# Altium PCB Gateway-Device-v1.0.PcbDoc (part 4 of 4)
Units mil, origin at the board's own origin, x right, y up, seen from the top; angles counter-clockwise.
Board outline 1968.5 x 3149.61 mil, 4 copper layers (Top Layer, Ground, Power, Bottom Layer), stack 61.654 mil thick; 142 components, 90 nets, 467 pads, 780 vias.
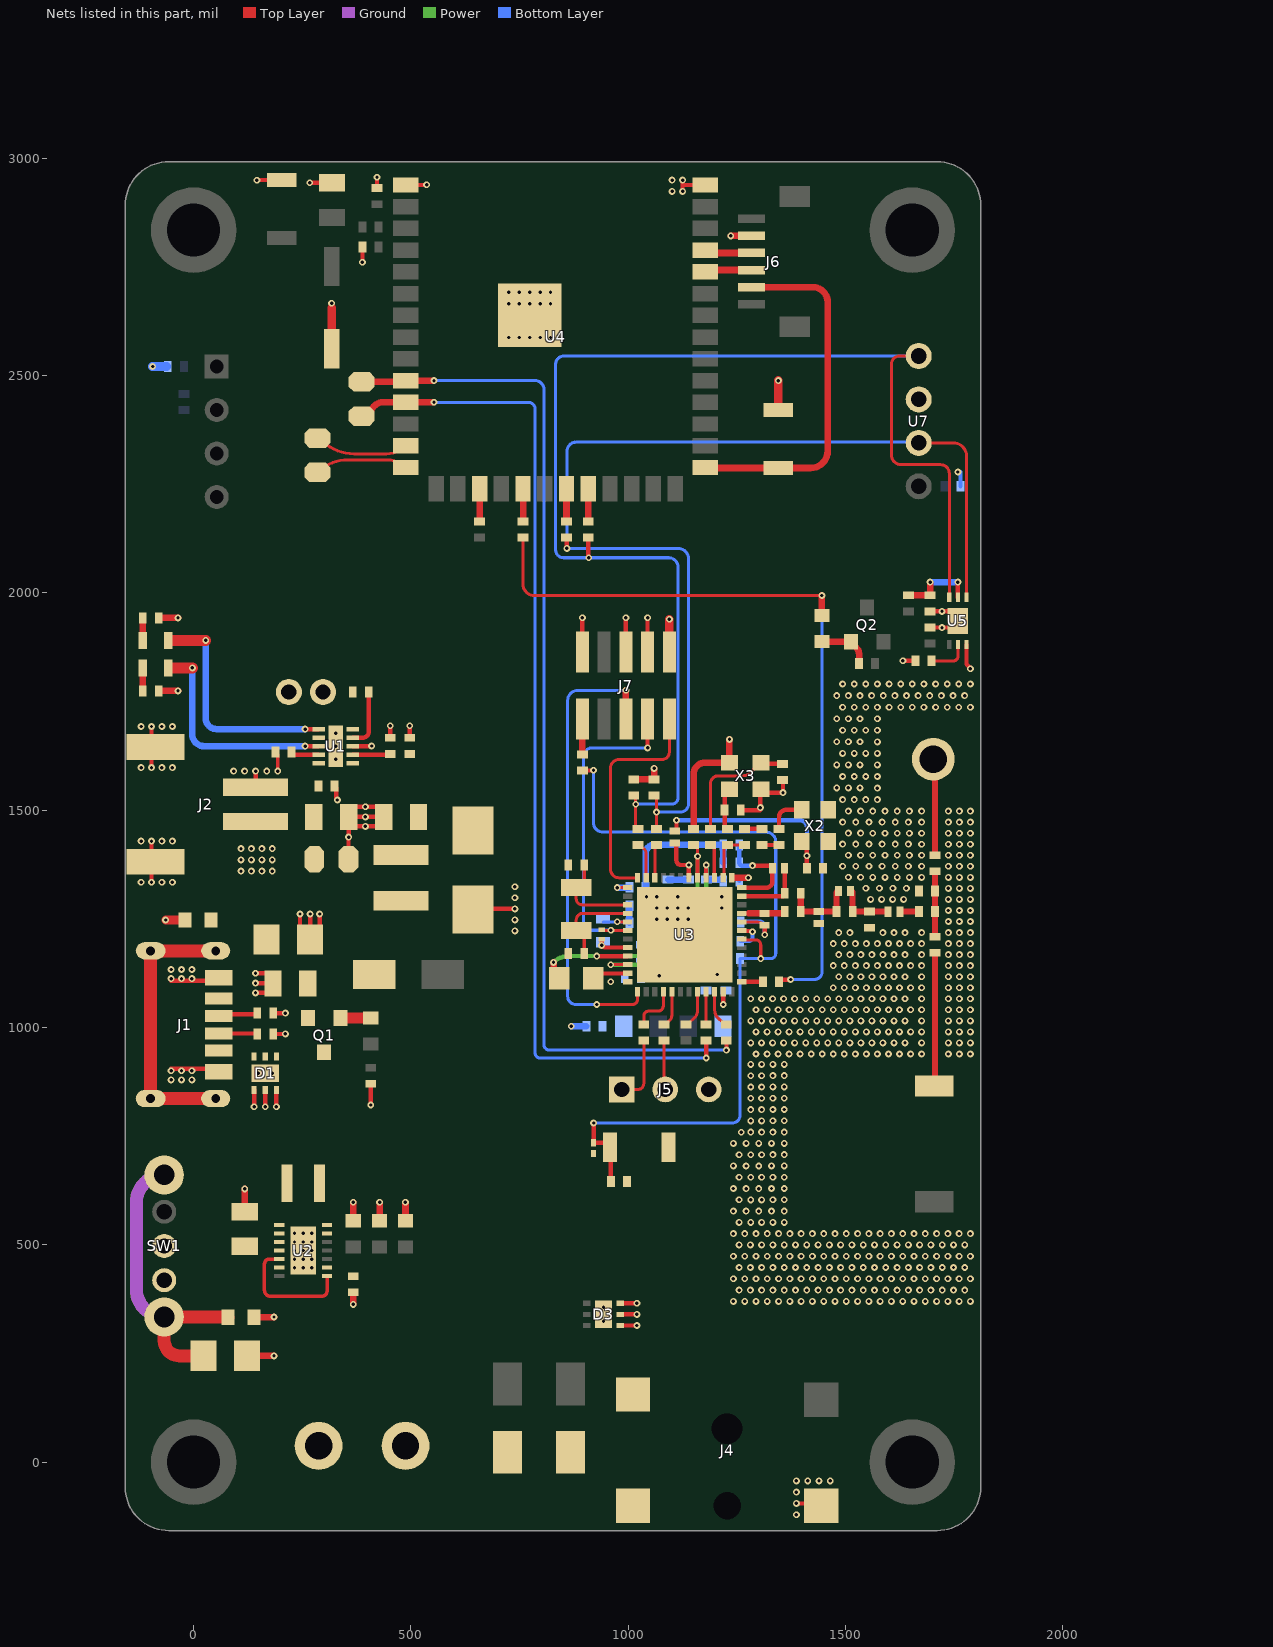
[diagram p4: the nets of this part, all layers, seen from the top]

## Via types
v1: diameter 15.75, hole 7.87, Top Layer to Bottom Layer, tented both sides, 780 vias

## Nets (pads, with @x,y where several pads share a name; then routed paths per layer and width w, separated by ;. In a path a pad name is that pad's centre, name@x,y a point inside that pad or via, vN(x,y) a via of type N, cw(c..) or ccw(c..) an arc to the next point about the centre after c; other vN are vias at no path point) (continued)
GND: C1.1 C2.1 C3.1 C4.1 C5.1 C6.1 C7.1 C8.1 C9.1 C10.1 C11.1 C12.1 C13.2 C14.1 C15.1 C16.1 C17.1 C18.1 C19.1 C20.1 C21.1 C22.1 C23.1 C24.1 C25.1 C26.1 C27.1 C28.1 C29.1 C30.1 C31.1 C35.1 C36.1 C37.1 C38.1 C40.1 C41.1 C42.1 C44.1 C45.1 C46.1 C47.1 C48.1 C49.1 C50.1 D1.1 D1.2 D1.3 D1.7 D2.1 D3.1 D3.2 D3.3 D3.7 D7.2 J1.A12 J1.B12 J2.1 J2.3 J2.4 J3.2 J4.2@1444.06,-100.43 J5.3 J6.2 J7.3 J7.5 J7.9 NTC1.1 R1.2 R3.2 R6.1 R7.1 R8.1 R9.1 R11.1 R25.2 R41.1 SW2.2 SW3.2 SW4.2 TP1.2 U1.3 U1.11 U2.2 U2.13 U2.15 U3.48 U3.49 U4.1 U4.40 U4.41 U5.3 U5.7 U7.3 X2.1 X2.2 X3.2 X3.4 | length 4323.7
  Top Layer w7: R7.1@188.37,1633.65 193.48,1628.54 v1(193.48,1590.09)
  Top Layer w10: v1(-97,1334.26) -97,1372.26 cw(c-87.63,1372.27) J2.3@-87.63,1381.63 cw(c-87.63,1391) -97,1391 v1(-97,1429) ; v1(-96.97,1598.05) -96.97,1636.05 cw(c-87.6,1636.05) J2.4@-87.63,1645.41 cw(c-87.6,1654.78) -96.97,1654.78 v1(-96.97,1692.78) ; v1@-51.93,905.54 -27.93,905.54 -3.93,905.54 50.59,905.54 cw(c50.59,898.26) J1.A12@57.87,898.26 ; v1@-51.93,1107.51 -3.93,1107.51 J1.B12@50.59,1107.51 ; v1(139.09,817.79) D1.1@139.09,856.4 ; v1@142.27,1125.01 C12.1@182.32,1125.01 ; v1@142.63,1079.81 C12.1@182.68,1079.81 ; v1@142.63,1101.65 C12.1@182.68,1101.65 ; J2.1@142.68,1565.07 v1(142.68,1590.09) ; v1(145.4,2949.65) cw(c146.13,2949.65) 146.13,2950.38 SW2.2@202.52,2950.38 ; v1(164.68,817.79) D1.2@164.68,856.4 ; R3.2@183.18,985.29 v1(211,985.29) ; R1.2@183.18,1033.21 v1(211,1033.21) ; v1(190.27,817.79) D1.3@190.27,856.4 ; C5.1@244.65,1221.35 v1(244.65,1261.3) v1@244.65,1261.41 ; v1(267,2944) C14.1@318.58,2944.02 ; C5.1@268,1221 v1@268,1261.05 ; C5.1@289.84,1221 v1@289.84,1261.05 ; C2.1@324.02,1555.99 327.91,1552.11 327.91,1528.01 330.8,1525.12 v1(330.8,1523.57) ; C1.1@356.17,1508.19 v1(395.12,1508.19) C3.1@435.06,1508.19 ; TP1.2@356.32,1384.21 TP1.2@356.32,1387.21 356.32,1434.12 356.52,1434.12 v1(356.52,1438.12) C1.1@356.52,1463 ; U1.3@366.07,1647.34 366.32,1647.59 409.38,1647.59 v1(409.63,1647.85) ; v1(388.37,2760.78) C26.1@388.36,2796.45 ; v1(407.52,821.79) R11.1@407.52,870.52 ; C15.1@421.88,2931.52 v1(421.88,2956.45) ; C3.1@435.42,1463 v1(395.12,1463) C1.1@356.52,1463 ; C3.1@435.42,1484.84 v1(395.12,1484.84) C1.1@356.52,1484.84 C1.1@356.52,1463 ; R8.1@452.41,1666.65 v1(452.41,1694.58) ; U4.1@488.25,2938.74 536.14,2938.74 v1(536.14,2939.12) ; C4.1@497.32,1666.65 v1(497.32,1694.58) ; D2.1@642.52,1271.97 cw(c643.73,1271.97) 643.73,1273.17 v1(739.32,1273.17) ; J7.9@894.45,1863.72 v1(894.45,1943) ; D3.1@981.39,314.41 v1(1020,314.41) ; D3.2@981.39,340 v1(1020,340) ; D3.3@981.39,365.59 v1(1020,365.59) ; J7.5@994.45,1863.72 v1(994.45,1943) ; J7.3@1044.45,1863.72 v1(1044.45,1943) ; v1(1125,2924) 1125,2938.74 ; v1(1125,2950) 1125,2938.74 ; U4.40@1177.22,2938.74 1125,2938.74 ; C44.1@1258.86,1500.38 1303.22,1500.38 ccw(c1303.22,1501.12) 1303.95,1501.12 v1(1303.95,1506.12) 1303.95,1546.79 cw(c1305.78,1546.79) X3.2@1305.78,1548.61 ccw(c1313.77,1548.61) 1313.77,1540.62 v1(1356.05,1540.62) 1356.05,1569.62 C45.1@1355.36,1569.62 ; v1(1387,-95) 1438.63,-95 cw(c1438.63,-100.43) J4.2@1444.06,-100.43 cw(c1444.06,-95.37) J4.2@1439,-95.37 ; v1(1632.02,1843.89) R41.1@1661.02,1843.89 ; C49.1@1694.52,1920.39 v1(1721.96,1920.39) 1743.39,1920.39 ccw(c1743.39,1935.52) U5.7@1758.52,1935.52 ccw(c1736.39,1935.52) 1736.39,1957.66 v1(1721.96,1957.66) C50.1@1694.52,1957.66 ; U5.3@1778.21,1881.39 1778.21,1836.1 1787.15,1827.15 v1(1787.15,1825.6)
  Top Layer w15: C29.1@1150.48,1457.12 1150.48,1583.03 cw(c1177.09,1583.03) 1177.09,1609.63 X3.4@1232.94,1609.63 v1(1232.94,1662.93) ; v1(1236,2821.72) J6.2@1283.63,2821.72
  Top Layer w15.33: C6.1@117.52,576.4 v1(117.52,628.78) ; C10.1@122.76,244.52 v1(184.91,244.52) ; R9.1@138.76,333.41 184.91,333.41 v1(184.91,334.02) ; v1(367.35,363) C11.1@367.35,390.89 ; C7.1@367.34,555.45 v1(367.34,598.12) ; C9.1@427.97,555.45 v1(427.97,598.12) ; C8.1@487.35,555.45 v1(487.35,598.12)
  Top Layer w20: v1(-64.37,1247.52) R6.1@-20.22,1247.52 ; C13.2@317.58,2562.05 317.58,2656.54 ; SW3.2@1345.52,2421.38 v1(1345.52,2488.74)
  Bottom Layer w10: C25.1@1039.87,1241.15 1042.59,1243.87 1042.59,1277.45 C24.1@1039.87,1280.16 1042.09,1282.37 v1(1042.09,1301.05) v1@1040.99,1302.15 ; C23.1@1039.87,1322.89 C23.1@1040.99,1321.78 ; v1@1041.99,1302.15 C23.1@1041.99,1321.78 ; C42.1@1091.8,1301.05 v1(1114.09,1301.05) v1(1215.09,1301.05) ; 1191.09,1249.05 1215.95,1249.05 cw(c1215.95,1243.15) C46.1@1221.86,1243.15 ; C48.1@1764.52,2245.38 v1@1764.52,2278.27
  Bottom Layer w15: C27.1@903.91,1003.1 903.86,1003.05 v1@869.05,1003.05 ; C28.1@1029,1114.46 1029,1152.66 cw(c1029.96,1152.66) C16.1@1029.96,1153.61 C17.1@1071.03,1153.61 1071.09,1153.61 v1(1071.09,1119.05) ; C23.1@1039.87,1322.89 1039.87,1400.79 cw(c1059.37,1400.79) 1059.37,1420.29 C31.1@1218.54,1420.29 C30.1@1218.54,1379.07 ; C22.1@1179.26,1121.96 C18.1@1224.54,1121.96 ; v1(869,1003) v1@869.05,1003.05
  Bottom Layer w20: v1(-94.5,2521) C47.1@-61.97,2521
  other v1: 1387,-121 1387,-69 1387,-43 1413,-43 1439,-43 1465,-43 943,324.2 943,356.8 1242.07,370 1268.03,370 1294,370 1319.97,370 1345.93,370 1371.9,370 1397.86,370 1423.83,370 1449.8,370 1475.76,370 1501.73,370 1527.69,370 1553.66,370 1579.62,370 1605.59,370 1631.56,370 1657.52,370 1683.49,370 1709.45,370 1735.42,370 1761.39,370 1787.35,370 1255.05,395.97 1281.02,395.97 1306.98,395.97 1332.95,395.97 1358.91,395.97 1384.88,395.97 1410.85,395.97 1436.81,395.97 1462.78,395.97 1488.74,395.97 1514.71,395.97 1540.68,395.97 1566.64,395.97 1592.61,395.97 1618.57,395.97 1644.54,395.97 1670.51,395.97 1696.47,395.97 1722.44,395.97 1748.4,395.97 1774.37,395.97 1242.07,421.94 1268.03,421.94 1294,421.94 1319.97,421.94 1345.93,421.94 1371.9,421.94 1397.86,421.94 1423.83,421.94 1449.8,421.94 1475.76,421.94 1501.73,421.94 1527.69,421.94 1553.66,421.94 1579.62,421.94 1605.59,421.94 1631.56,421.94 1657.52,421.94 1683.49,421.94 1709.45,421.94 1735.42,421.94 1761.39,421.94 1787.35,421.94 1255.05,447.9 1281.02,447.9 1306.98,447.9 1332.95,447.9 1358.91,447.9 1384.88,447.9 1410.85,447.9 1436.81,447.9 1462.78,447.9 1488.74,447.9 1514.71,447.9 1540.68,447.9 1566.64,447.9 1592.61,447.9 1618.57,447.9 1644.54,447.9 1670.51,447.9 1696.47,447.9 1722.44,447.9 1748.4,447.9 1774.37,447.9 1242.07,473.87 1268.03,473.87 1294,473.87 1319.97,473.87 1345.93,473.87 1371.9,473.87 1397.86,473.87 1423.83,473.87 1449.8,473.87 1475.76,473.87 1501.73,473.87 1527.69,473.87 1553.66,473.87 1579.62,473.87 1605.59,473.87 1631.56,473.87 1657.52,473.87 1683.49,473.87 1709.45,473.87 1735.42,473.87 1761.39,473.87 1787.35,473.87 1255.05,499.83 1281.02,499.83 1306.98,499.83 1332.95,499.83 1358.91,499.83 1384.88,499.83 1410.85,499.83 1436.81,499.83 1462.78,499.83 1488.74,499.83 1514.71,499.83 1540.68,499.83 1566.64,499.83 1592.61,499.83 1618.57,499.83 1644.54,499.83 1670.51,499.83 1696.47,499.83 1722.44,499.83 1748.4,499.83 1774.37,499.83 1242.07,525.8 1268.03,525.8 1294,525.8 1319.97,525.8 1345.93,525.8 1371.9,525.8 1397.86,525.8 1423.83,525.8 1449.8,525.8 1475.76,525.8 1501.73,525.8 1527.69,525.8 1553.66,525.8 1579.62,525.8 1605.59,525.8 1631.56,525.8 1657.52,525.8 1683.49,525.8 1709.45,525.8 1735.42,525.8 1761.39,525.8 1787.35,525.8 1255.05,551.77 1282,551.64 1307.01,551.64 1332.92,551.77 1358.89,551.77 1242.07,577.73 1271.27,577.6 1300.48,577.6 1329.68,577.73 1358.89,577.73 1255.05,603.7 1282,603.57 1307.01,603.57 1332.92,603.7 1358.89,603.7 1242.07,629.66 1271.27,629.54 1300.48,629.54 1329.68,629.66 1358.89,629.66 1255.05,655.63 1282,655.5 1307.01,655.5 1332.92,655.63 1358.89,655.63 1271.27,681.47 1300.48,681.47 1242.07,681.6 1329.68,681.6 1358.89,681.6 1255.05,707.31 1282,707.43 1307.01,707.43 1332.92,707.56 1358.89,707.56 1271.27,733.4 1300.48,733.4 1242.07,733.53 1329.68,733.53 1358.89,733.53 1260.05,758.98 1282,759.36 1307.01,759.36 1332.92,759.49 1358.89,759.49 1282,785.33 1307.01,785.33 1332.92,785.46 1358.89,785.46 1282,811.3 1307.01,811.3 1332.92,811.42 1358.89,811.42 1282,837.26 1307.01,837.26 1332.92,837.39 1358.89,837.39 1282,863.23 1307.01,863.23 1332.92,863.36 1358.89,863.36 -51.93,879.54 -27.93,879.54 -3.93,879.54 1282,889.19 1307.01,889.19 1332.92,889.32 1358.89,889.32 148.88,894.79 181.47,894.79 -51.93,900.54 -27.93,900.54 -3.93,900.54 1282,915.16 1307.01,915.16 1332.92,915.29 1358.89,915.29 1294,939.2 1319.4,939.2 1344.8,939.2 1370.2,939.2 1395.6,939.2 1421,939.2 1446.4,939.2 1471.8,939.2 1497.2,939.2 1522.6,939.2 1548,939.2 1573.4,939.2 1598.8,939.2 1624.2,939.2 1649.6,939.2 1675,939.2 1736.55,939.2 1761.95,939.2 1787.35,939.2 1282,964.6 1306.7,964.6 1332.1,964.6 1357.5,964.6 1382.9,964.6 1408.3,964.6 1433.7,964.6 1459.1,964.6 1484.5,964.6 1509.9,964.6 1535.3,964.6 1560.7,964.6 1586.1,964.6 1611.5,964.6 1636.9,964.6 1675,964.6 1736.55,964.6 1761.95,964.6 1787.35,964.6 1294,990 1319.4,990 1344.8,990 1370.2,990 1395.6,990 1421,990 1446.4,990 1471.8,990 1497.2,990 1522.6,990 1548,990 1573.4,990 1598.8,990 1624.2,990 1649.6,990 1675,990 1736.55,990 1761.95,990 1787.35,990 1282,1015.4 1306.7,1015.4 1332.1,1015.4 1357.5,1015.4 1382.9,1015.4 1408.3,1015.4 1433.7,1015.4 1459.1,1015.4 1484.5,1015.4 1509.9,1015.4 1535.3,1015.4 1560.7,1015.4 1586.1,1015.4 1611.5,1015.4 1636.9,1015.4 1675,1015.4 1736.55,1015.4 1761.95,1015.4 1787.35,1015.4 1294,1040.8 1319.4,1040.8 1344.8,1040.8 1370.2,1040.8 1395.6,1040.8 1421,1040.8 1446.4,1040.8 1471.8,1040.8 1497.2,1040.8 1522.6,1040.8 1548,1040.8 1573.4,1040.8 1598.8,1040.8 1624.2,1040.8 1649.6,1040.8 1675,1040.8 1736.55,1040.8 1761.95,1040.8 1787.35,1040.8 1282,1066.2 1306.7,1066.2 1332.1,1066.2 1357.5,1066.2 1382.9,1066.2 1408.3,1066.2 1433.7,1066.2 1459.1,1066.2 1484.5,1066.2 1509.9,1066.2 1535.3,1066.2 1560.7,1066.2 1586.1,1066.2 1611.5,1066.2 1636.9,1066.2 1675,1066.2 1736.55,1066.2 1761.95,1066.2 1787.35,1066.2 142.37,1079.81 1471.8,1091.6 1497.2,1091.6 1522.6,1091.6 1548,1091.6 1573.4,1091.6 1598.8,1091.6 1624.2,1091.6 1649.6,1091.6 1675,1091.6 1736.55,1091.6 1761.95,1091.6 1787.35,1091.6 142.37,1102.41 959.7,1105.26 -51.93,1112.51 -27.93,1112.51 -3.93,1112.51 1484.5,1117 1509.9,1117 1535.3,1117 1560.7,1117 1586.1,1117 1611.5,1117 1636.9,1117 1675,1117 1736.55,1117 1761.95,1117 1787.35,1117 1204.72,1122.01 142.37,1125.01 -51.93,1133.51 -27.93,1133.51 -3.93,1133.51 1471.8,1142.4 1497.2,1142.4 1522.6,1142.4 1548,1142.4 1573.4,1142.4 1598.8,1142.4 1624.2,1142.4 1649.6,1142.4 1675,1142.4 1736.55,1142.4 1761.95,1142.4 1787.35,1142.4 1484.5,1167.8 1509.9,1167.8 1535.3,1167.8 1560.7,1167.8 1586.1,1167.8 1611.5,1167.8 1636.9,1167.8 1675,1167.8 1736.55,1167.8 1761.95,1167.8 1787.35,1167.8 1471.8,1193.2 1497.2,1193.2 1522.6,1193.2 1548,1193.2 1573.4,1193.2 1598.8,1193.2 1624.2,1193.2 1649.6,1193.2 1675,1193.2 1736.55,1193.2 1761.95,1193.2 1787.35,1193.2 1484.5,1218.6 1509.9,1218.6 1586.1,1218.6 1611.5,1218.6 1636.9,1218.6 1675,1218.6 1736.55,1218.6 1761.95,1218.6 1787.35,1218.6 739.32,1222.37 1736.55,1244 1761.95,1244 1787.35,1244 739.32,1247.77 1066.09,1249.05 1090.09,1249.05 1114.09,1249.05 1138.09,1249.05 268,1261.3 289.84,1261.3 1736.55,1269.4 1761.95,1269.4 1787.35,1269.4 1066.09,1275.05 1090.09,1275.05 1114.09,1275.05 1138.09,1275.05 1215.09,1275.05 1557.56,1294.8 1582.96,1294.8 1608.36,1294.8 1633.76,1294.8 1736.55,1294.8 1761.95,1294.8 1787.35,1294.8 739.32,1298.57 1066.09,1301.05 1546.88,1320.38 1577.88,1320.38 1608.88,1320.38 1639.88,1320.38 1736.55,1320.2 1761.95,1320.2 1787.35,1320.2 739.32,1323.97 -121,1334.26 -73,1334.26 -49,1334.26 1506.54,1345.78 1534.62,1345.78 1562.69,1345.6 1590.77,1345.6 1618.85,1345.6 1646.92,1345.6 1675,1345.6 1736.55,1345.6 1761.95,1345.6 1787.35,1345.6 1493.4,1371.18 1523.66,1371.18 1553.93,1371.18 1584.2,1371.18 1614.47,1371.18 1644.73,1371.18 1675,1371 1736.55,1371 1761.95,1371 1787.35,1371 1562.69,1396.4 1590.77,1396.4 1618.85,1396.4 1646.92,1396.4 1675,1396.4 1736.55,1396.4 1761.95,1396.4 1787.35,1396.4 1506.54,1396.58 1534.62,1396.58 1493.4,1421.98 1523.66,1421.98 1553.93,1421.98 1584.2,1421.98 1614.47,1421.98 1644.73,1421.98 1675,1421.8 1736.55,1421.8 1761.95,1421.8 1787.35,1421.8 -121,1429 -73,1429 -49,1429 1506.54,1447.38 1534.62,1447.38 1562.69,1447.2 1590.77,1447.2 1618.85,1447.2 1646.92,1447.2 1675,1447.2 1736.55,1447.2 1761.95,1447.2 1787.35,1447.2 1493.4,1472.78 1523.66,1472.78 1553.93,1472.78 1584.2,1472.78 1614.47,1472.78 1644.73,1472.78 1675,1472.6 1736.55,1472.6 1761.95,1472.6 1787.35,1472.6 1506.54,1498.18 1534.62,1498.18 1562.69,1498 1590.77,1498 1618.85,1498 1646.92,1498 1675,1498 1736.55,1498 1761.95,1498 1787.35,1498 1493.17,1524.56 1519.91,1524.56 1546.66,1524.56 1573.4,1524.56 1479.8,1551.3 1506.54,1551.3 1533.28,1551.3 1573.4,1551.12 1493.17,1577.68 1519.91,1577.68 1546.66,1577.68 1573.4,1577.68 91.88,1590.09 117.28,1590.09 168.08,1590.09 -120.97,1598.05 -72.97,1598.05 -48.97,1598.05 1479.8,1604.43 1506.54,1604.43 1533.28,1604.43 1573.4,1604.24 326.89,1617.65 1493.17,1630.8 1519.91,1630.8 1546.66,1630.8 1573.4,1630.8 326.89,1647.34 1573.4,1657.36 1479.8,1657.55 1506.54,1657.55 1533.28,1657.55 326.89,1677.02 1493.17,1683.92 1519.91,1683.92 1546.66,1683.92 1573.4,1683.92 -120.97,1692.78 -72.97,1692.78 -48.97,1692.78 1479.8,1710.67 1506.54,1710.67 1533.28,1710.67 1573.4,1710.48 1493.17,1737.05 1519.91,1737.05 1546.66,1737.05 1573.4,1737.05 1600.14,1737.05 1626.89,1737.05 1653.63,1737.05 1680.38,1737.05 1707.12,1737.05 1733.86,1737.05 1760.61,1737.05 1787.35,1737.05 1479.8,1763.79 1506.54,1763.79 1533.28,1763.79 1560.03,1763.79 1586.77,1763.79 1613.52,1763.79 1640.26,1763.79 1667,1763.79 1693.75,1763.79 1720.49,1763.79 1747.24,1763.79 1773.98,1763.79 1493.17,1790.53 1519.91,1790.53 1546.66,1790.53 1573.4,1790.53 1600.14,1790.53 1626.89,1790.53 1653.63,1790.53 1680.38,1790.53 1707.12,1790.53 1733.86,1790.53 1760.61,1790.53 1787.35,1790.53 1758.51,2278.28 725.15,2587.77 749.15,2587.77 773.15,2587.77 797.15,2587.77 821.15,2587.77 725.15,2665.77 749.15,2665.77 773.15,2665.77 797.15,2665.77 821.15,2665.77 317.58,2666.54 725.15,2691.77 749.15,2691.77 773.15,2691.77 797.15,2691.77 821.15,2691.77 1101,2924 1101,2950
I2C2_SCL: R19.1 R23.1 R33.1 U5.6 U7.4 | length 3068.2
  Top Layer w7: v1@907.93,2082.07 ccw(c909,2082.07) v1(909,2081) ; R33.1@1017.2,1535.68 1017.2,1462.6 ccw(c1022.69,1462.6) R19.1@1022.69,1457.12 ; U7.4@1668.32,2545.38 1624,2545.38 ccw(c1624,2527.38) 1606,2527.38 1606,2316.8 ccw(c1627.7,2316.8) 1627.7,2295.11 1718.7,2295.11 cw(c1718.7,2274.96) 1738.84,2274.96 U5.6@1738.84,1989.66
  Top Layer w10: v1@907.93,2082.07 R23.1@907.93,2127.52
  Bottom Layer w7: v1(1017.31,1514) 1099.37,1514 ccw(c1099.37,1529.32) 1114.69,1529.32 1114.69,2059.59 ccw(c1093.28,2059.59) 1093.28,2081 v1(909,2081) 850.92,2081 cw(c850.92,2098.92) 833,2098.92 833,2526.48 cw(c851.9,2526.48) 851.9,2545.38 U7.4@1668.32,2545.38
I2C2_SDA: R18.1 R22.1 R32.1 U5.4 U7.2 | length 2545
  Top Layer w7: R22.1@857.93,2127.52 R22.1@858.77,2126.69 ; R32.1@1059.67,1534.12 1065,1528.79 v1(1065,1495.63) 1065,1457.45 R18.1@1064.67,1457.12 ; U7.2@1668.32,2345.38 1748,2345.38 cw(c1748,2315.17) 1778.21,2315.17 U5.4@1778.21,1989.66
  Top Layer w10: v1(858.76,2102.59) R22.1@858.77,2126.69
  Bottom Layer w7: v1@1065,1496 1120.67,1496 ccw(c1120.67,1513.77) 1138.44,1513.77 1138.44,2079.11 ccw(c1114.96,2079.11) 1114.96,2102.59 v1(858.76,2102.59) 858.76,2325.58 cw(c880.18,2325.58) 880.18,2347 1666.71,2347 cw(c1666.71,2345.38) U7.2@1668.32,2345.38
IO0: J6.5 SW3.1 U4.27 | length 841.9
  Top Layer w15.33: U4.27@1177.22,2288.74 1178.44,2287.52 1419.52,2287.52 ccw(c1419.52,2327) 1459,2327 1459,2669 ccw(c1424.39,2669) 1424.39,2703.61 J6.5@1283.63,2703.61
NetANT1_1: ANT1.1 R30.2 | length 306.5
  Top Layer w13.98: ANT1.1@1705.78,865.54 R30.2@1705.78,1172.02
NetANT2_1: ANT2.1 R35.2 | length 222.5
  Top Layer w13.98: ANT2.1@1701.96,1617.52 1705.82,1613.67 R35.2@1705.82,1396.63
NetC3_2: C3.2 C4.2 D2.2 F1.2 U1.1
NetC5_2: C5.2 J1.MH1 J1.MH2 J1.MH3 J1.MH4 R6.2 | length 639.4
  Top Layer w30: J1.MH1@50.78,836.44 J1.MH2@-98.82,836.44 J1.MH3@-98.82,1176.6 J1.MH4@50.78,1176.6
NetC10_2: C10.2 R9.2 SW1.4 SW1.5 | length 712.5
  Top Layer w30: C10.2@22.76,244.52 -32.69,244.52 cw(c-32.69,279.52) -67.69,279.52 SW1.5@-67.69,334.02 77.15,334.02 cw(c77.15,332.41) R9.2@78.76,332.41
  Ground w30: SW1.5@-67.69,334.02 cw(c-67.69,398.33) -132,398.33 -132,596.48 cw(c-67.69,596.48) SW1.4@-67.69,660.79
NetC11_2: C11.2 U2.1 U2.12 | length 293.8
  Top Layer w8: U2.12@196.72,467.26 173.95,467.26 ccw(c173.95,456.31) 163,456.31 163,395.08 ccw(c176.2,395.08) 176.2,381.89 295.65,381.89 ccw(c295.65,393.19) 306.96,393.19 U2.1@306.96,427.89
NetC19_2: C19.2 U3.39 X1.2 | length 214.5
  Top Layer w7: C19.2@898.8,1373.62 898.8,1340.39 cw(c880.3,1340.39) X1.2@880.3,1321.89 880.3,1296.3 ccw(c894.08,1296.3) 894.08,1282.52 U3.39@999.05,1282.52
NetC20_2: C20.2 U3.40 X1.1 | length 215.1
  Top Layer w7: C20.2@898.8,1170.31 898.8,1204.96 ccw(c880.3,1204.96) X1.1@880.3,1223.46 880.3,1247.09 cw(c896.05,1247.09) 896.05,1262.83 U3.40@999.05,1262.83
NetC24_2: C24.2 C25.2 FB1.2 U3.41 | length 126.6
  Top Layer w7: v1(974.7,1243.44) 974.7,1243.15 U3.41@999.05,1243.15
  Bottom Layer w7: FB1.2@941.95,1243.18 C25.2@1002.87,1243.18
  Bottom Layer w15: C25.2@1002.87,1241.15 C24.2@1002.87,1282.16
NetC30_2: C30.2 C31.2 L3.2 U3.24 | length 230.9
  Top Layer w10: U3.24@1260.86,1321.89 1318.14,1321.89 ccw(c1318.14,1335.49) 1331.74,1335.49 L3.2@1331.74,1366.7 ; v1(1286,1372.7) L3.2@1331.74,1372.7
  Bottom Layer w10: C31.2@1255.54,1420.29 C30.2@1255.54,1379.07 ccw(c1261.91,1379.07) 1261.91,1372.7 v1(1286,1372.7)
NetC32_1: C32.1 C33.2 C36.2 C39.2 L4.1 | length 174.8
  Top Layer w13.98: C33.2@1397,1309.11 C39.2@1397,1266.77 C36.2@1438.55,1266.77 C32.1@1479.47,1266.77 1479.47,1309.38 cw(c1484.2,1309.38) L4.1@1484.2,1314.11
NetC32_2: C32.2 C37.2 L4.2 L5.1 | length 131.2
  Top Layer w13.98: L4.2@1511.75,1314.11 cw(c1511.75,1309.4) 1516.47,1309.4 C32.2@1516.47,1266.77 C37.2@1555.52,1266.77 L5.1@1597.67,1266.77
NetC33_1: C33.1 L3.1 U3.23 | length 160.6
  Top Layer w10: U3.23@1260.86,1302.2 1356,1302.2 1360,1306.2 L3.1@1360,1366.01
NetC34_1: C34.1 L5.2 | length 41.5
  Top Layer w13.98: L5.2@1625.23,1266.77 C34.1@1666.71,1266.77
NetC34_2: C34.2 C38.2 R30.1 R35.1 | length 150.5
  Top Layer w13.98: R30.1@1705.71,1209.02 C34.2@1705.71,1266.77 C38.2@1705.71,1314.11 R35.1@1705.71,1359.52
NetC35_2: C35.2 FB2.1 X2.4 | length 468.3
  Top Layer w10: FB2.1@1110.8,1452.39 1111,1452.6 v1(1111,1477) ; X2.4@1398.95,1428.29 cw(c1398.95,1416.28) 1410.97,1416.28 C35.2@1410.97,1366.7
  Bottom Layer w10: v1(1111,1477) 1395.58,1477 cw(c1395.58,1461.41) 1411.17,1461.41 v1(1411.17,1395.27)
NetC39_1: C39.1 L6.2 U3.21 | length 85.5
  Top Layer w15: 1277.37,1263.01 1358.5,1263.01 1360,1264.51 C39.1@1360,1266.77
NetC43_1: C43.1 R36.2 | length 43
  Top Layer w10: C43.1@1303.95,1420.12 R36.2@1346.91,1420.12
NetC43_2: C43.2 R37.1 | length 43.1
  Top Layer w10: R37.1@1260.86,1457.12 C43.2@1303.95,1457.12
NetC44_2: C44.2 R38.1 X3.1 | length 92.4
  Top Layer w10: X3.1@1221.86,1548.61 C44.2@1221.86,1500.38 1221.86,1458.8 ccw(c1223.54,1458.8) R38.1@1223.54,1457.12
NetC45_2: C45.2 R39.1 X3.3 | length 292.5
  Top Layer w7: R39.1@1189.59,1457.11 1189.59,1562.12 cw(c1206.59,1562.12) 1206.59,1579.12 1261.8,1579.12 ccw(c1261.8,1609.63) 1285.41,1590.31 1289.59,1595.42 X3.3@1305.78,1609.63
  Top Layer w10: X3.3@1305.78,1609.63 ccw(c1313.05,1616.9) 1313.05,1606.62 C45.2@1355.36,1606.62
NetC46_2: C46.2 L6.1 U3.20 | length 157.3
  Top Layer w7: U3.20@1260.86,1243.15 1294.78,1243.15 cw(c1294.78,1216.27) L6.1@1313.79,1235.28 ; v1@1313.79,1213.75 v1(1313.99,1213.55)
  Top Layer w10: v1@1313.79,1213.75 L6.1@1313.79,1235.28
  Bottom Layer w7: C46.2@1258.86,1243.15 cw(c1259.83,1243.15) C46.2@1259.83,1244.12
  Bottom Layer w10: C46.2@1259.83,1244.12 1300.32,1244.12 cw(c1300.32,1230.65) 1313.79,1230.65 1313.79,1213.55 v1(1313.99,1213.55)
NetC50_2: C50.2 R40.1 U5.5 | length 180.4
  Top Layer w7: R40.1@1644.52,1995.85 ccw(c1645.72,1995.85) R40.1@1645.72,1994.66
  Top Layer w10: U5.5@1758.52,1989.66 v1(1758.52,2025)
  Top Layer w15: R40.1@1645.72,1994.66 C50.2@1694.52,1994.66 v1(1694.52,2025)
  Bottom Layer w15: v1(1694.52,2025) v1(1758.52,2025)
NetD4_2: D4.2 J3.1
NetD5_2: D5.2 J4.1
NetJ1_A5: J1.A5 R1.1 | length 91.2
  Top Layer w10: J1.A5@57.87,1026.21 62.29,1030.62 143.59,1030.62 R1.1@146.18,1033.21
NetJ1_B5: J1.B5 R3.1 | length 88
  Top Layer w10: J1.B5@58.53,986.18 145.29,986.18 R3.1@146.18,985.29
NetL1_1: L1.1 U2.8 U2.9
NetL1_2: L1.2 U2.6 U2.7
NetL2_2: L2.2 U3.47 | length 84.2
  Top Layer w9: L2.2@930.92,1124.66 U3.47@998.67,1124.66
  Top Layer w10: L2.2@919.67,1113.41 L2.2@930.92,1124.66 ; U3.47@998.67,1124.66 U3.47@999.05,1125.04
NetLED1_1: LED1.1 R2.1 | length 52.9
  Top Layer w15: R2.1@-117.16,1774.63 LED1.1@-117.16,1827.52
NetLED1_2: LED1.2 U1.8 | length 510.5
  Top Layer w10: v1(256.52,1647.53) 278.15,1647.53 U1.8@287.72,1647.34
  Top Layer w25: LED1.2@-54.28,1827.52 v1(-3,1827.52)
  Bottom Layer w15: v1(-3,1827.52) -3,1674.29 ccw(c23.77,1674.29) 23.77,1647.53 v1(256.52,1647.53)
NetLED2_1: LED2.1 R4.1 | length 51.8
  Top Layer w15: LED2.1@-117.16,1890.76 R4.1@-117.16,1942.52
NetNTC1_2: NTC1.2 R5.1 U1.5
NetQ1_1: Q1.1 R10.2 | length 70
  Top Layer w25: Q1.1@337.48,1022.2 R10.2@407.52,1022.2
NetQ2_1: Q2.1 R43.2 R44.2 | length 123.8
  Top Layer w15: R44.2@1445.52,1888.01 Q2.1@1512.12,1888.01 1524.76,1873.72 cw(c1512.12,1859.67) 1531.02,1859.67 R43.2@1531.02,1837.42
NetR5_2: R5.2 U1.4 | length 136
  Top Layer w10: U1.4@366.07,1667.02 389.18,1667.02 ccw(c389.18,1680.91) 403.07,1680.91 R5.2@403.07,1772.02
NetR7_2: R7.2 U1.9 | length 65.8
  Top Layer w10: R7.2@225.37,1633.65 ccw(c231.37,1633.65) 231.37,1627.65 U1.9@287.72,1627.65
NetR8_2: R8.2 U1.2 | length 88.6
  Top Layer w10: U1.2@366.07,1627.65 448.41,1627.65 ccw(c448.41,1631.65) R8.2@452.41,1631.65
NetR12_2: R12.2 U3.8 | length 86.8
  Top Layer w7: R12.2@1133.15,1007.12 1142.15,1012.62 1151.35,1021.43 ccw(c1133.15,1040.46) 1159.48,1040.46 U3.8@1159.48,1082.72
NetR13_2: R13.2 U3.9 | length 78.3
  Top Layer w7: R13.2@1174.35,1007.12 ccw(c1174.35,1011.94) 1179.17,1011.94 U3.9@1179.17,1082.72
NetR14_2: R14.2 U3.10 | length 86.8
  Top Layer w7: U3.10@1198.85,1082.72 1198.85,1040.46 ccw(c1225.19,1040.46) 1206.98,1021.43 1216.19,1012.62 R14.2@1225.19,1007.12
NetR15_2: R15.2 U3.13 | length 49.2
  Top Layer w10: U3.13@1260.86,1105.35 R15.2@1310.02,1105.35
NetR16_1: R16.1 U3.4 | length 110.5
  Top Layer w7: R16.1@1035.74,1007.12 1035.74,1026.75 cw(c1046.81,1026.75) 1046.81,1037.81 1068.37,1037.81 ccw(c1068.37,1050.19) 1080.74,1050.19 U3.4@1080.74,1082.72
NetR17_1: R17.1 U3.5 | length 83.9
  Top Layer w7: R17.1@1081.94,1007.12 1090.94,1012.62 1094.02,1015.28 ccw(c1081.94,1029.27) 1100.43,1029.27 U3.5@1100.43,1082.72
NetR18_2: R18.2 U3.34 | length 77.7
  Top Layer w7: U3.34@1061.06,1344.53 1061.06,1416.51 cw(c1064.67,1416.51) R18.2@1064.67,1420.12
NetR19_2: R19.2 U3.35 | length 84.2
  Top Layer w7: R19.2@1022.69,1420.12 1031.69,1414.62 1033.27,1413.53 cw(c1022.69,1398.13) 1041.37,1398.13 U3.35@1041.37,1344.53
NetR20_2: R20.2 U4.17 | length 75
  Top Layer w15: R20.2@657.93,2164.52 U4.17@657.93,2239.52
NetR21_2: R21.2 U4.19 | length 75.4
  Top Layer w15: R21.2@757.52,2164.52 757.93,2164.52 U4.19@757.93,2239.52
NetR22_2: R22.2 U4.21 | length 75
  Top Layer w15: R22.2@857.93,2164.52 U4.21@857.93,2239.52
NetR23_2: R23.2 U4.22 | length 75
  Top Layer w15: R23.2@907.93,2164.52 U4.22@907.93,2239.52
NetR24_1: R24.1 U3.19 | length 71.1
  Top Layer w9: U3.19@1260.86,1223.46 1261.95,1222.37 v1@1286,1222.37
  Bottom Layer w9: R24.1@1257.86,1198.57 1275.74,1198.57 ccw(c1275.74,1208.83) 1286,1208.83 v1(1286,1220.37)
NetR24_2: R24.2 R25.1 | length 38.5
  Bottom Layer w10: R25.1@1182.36,1198.57 R24.2@1220.86,1198.57
NetR36_1: R36.1 X2.3 | length 88.7
  Top Layer w10: R36.1@1346.91,1457.12 1346.91,1484.02 cw(c1364.01,1484.02) 1351.92,1496.11 cw(c1364.01,1484.02) 1364.01,1501.12 X2.3@1398.95,1501.12
NetR37_2: R37.2 R38.2 U3.26 | length 120.6
  Top Layer w7: U3.26@1218.54,1344.53 1220.4,1346.4 1220.4,1414.62 1225.9,1420.12 R38.2@1228.54,1420.12 R37.2@1267.86,1420.12
NetR39_2: R39.2 U3.27 | length 81.1
  Top Layer w7: R39.2@1189.59,1420.11 1192.41,1420.11 1197.91,1414.61 1197.91,1345.47 U3.27@1198.85,1344.53
NetR41_2: R41.2 U5.2 | length 93.8
  Top Layer w7: R41.2@1698.02,1843.89 1748.79,1843.89 ccw(c1748.79,1853.62) 1758.52,1853.62 U5.2@1758.52,1881.39
NRST: C21.2 D7.1 R29.2 R45.1 SW4.1 U3.18 | length 1896.6
  Top Layer w7: U3.18@1260.86,1203.78 U3.18@1260.94,1203.86 ; U3.18@1260.94,1201.86 1293.42,1201.86 cw(c1293.42,1190.36) 1304.92,1190.36 v1(1304.92,1158.5)
  Top Layer w10: R29.2@894.45,1591.4 920,1591.4 v1(920,1592) ; v1(920.28,780.44) D7.1@920.28,734.98 948.35,734.98 cw(c948.35,724.98) SW4.1@958.35,724.98 cw(c958.35,723.33) 960,723.33 C21.2@960,646
  Bottom Layer w7: v1(920,1592) 920,1471.14 ccw(c941.51,1471.14) 941.51,1449.62 1317.38,1449.62 cw(c1317.38,1427.57) 1339.44,1427.57 1339.44,1170.63 cw(c1327.31,1170.63) 1327.31,1158.5 1313.99,1158.5 R45.1@1257.19,1158.5 1257.19,797.85 cw(c1239.78,797.85) 1239.78,780.44 v1(920.28,780.44)
PB0-VDD_TCXO: C41.2 C42.2 FB2.2 U3.30 | length 185.5
  Top Layer w10: FB2.2@1110.8,1424.83 1110.8,1385.2 ccw(c1122,1385.2) 1122,1374 v1(1139.61,1374) 1139.61,1344.53 U3.30@1139.8,1344.53
  Bottom Layer w10: C41.2@1138.8,1340.53 1139.8,1341.53 1139.8,1373.81 v1(1139.61,1374)
  Bottom Layer w15: C42.2@1091.8,1340.53 C41.2@1138.8,1340.53
PG: LED2.2 U1.6 U1.7 | length 537
  Top Layer w10: v1(256.52,1686.71) U1.6@287.72,1686.71
  Top Layer w25: LED2.2@-55.45,1890.76 27.76,1890.76 v1(28,1891)
  Bottom Layer w15: v1(28,1891) 28,1711.36 ccw(c52.65,1711.36) 52.65,1686.71 v1(256.52,1686.71)
PWR_SW: R15.1 R21.1 R44.1 | length 1831.1
  Top Layer w7: R21.1@757.52,2127.52 757.52,2020.67 ccw(c784.04,2020.67) 784.04,1994.16 v1(1445.52,1994.16)
  Top Layer w10: R15.1@1347.02,1110.35 v1@1373.54,1110.35
  Top Layer w15: R44.1@1445.52,1948.01 v1(1445.52,1994.16)
  Bottom Layer w7: v1@1373.54,1111 1429.87,1111 ccw(c1429.87,1126.65) 1445.52,1126.65 v1(1445.52,1994.16)
  other v1: 1373.54,1110.55
RST: J7.10 R29.1 | length 81.8
  Top Layer w15: R29.1@894.45,1628.4 J7.10@894.45,1710.18
RXD0: J6.4 U4.36 | length 107.5
  Top Layer w15.33: U4.36@1177.22,2738.74 cw(c1187.48,2728.48) 1187.48,2742.98 J6.4@1283.63,2742.98
SWDCLK: J7.4 R31.1 U3.42 | length 742.3
  Top Layer w7: R31.1@939,1223.64 U3.42@998.87,1223.64
  Top Layer w10: v1(1044.45,1643.62) J7.4@1044.45,1710.18
  Bottom Layer w7: v1(959.95,1223.9) 910.84,1223.9 cw(c910.84,1237.87) 896.87,1237.87 896.87,1623.66 cw(c916.82,1623.66) 916.82,1643.62 v1(1044.45,1643.62)
SWDIO: J7.2 U3.36 | length 539.1
  Top Layer w7: U3.36@1021.69,1344.53 979,1344.53 cw(c979,1364.11) 959.41,1364.11 959.41,1597.33 cw(c978.95,1597.33) 978.95,1616.86 1077.96,1616.86 ccw(c1077.96,1633.36) 1094.45,1633.36 J7.2@1094.45,1710.18
SWO: J7.6 U3.1 | length 1090
  Top Layer w7: v1(927.41,1053.04) 1009.43,1053.04 ccw(c1009.43,1065.3) 1021.69,1065.3 U3.1@1021.69,1082.72
  Top Layer w15: J7.6@994.45,1710.18 v1(994.45,1776)
  Bottom Layer w7: v1(927.41,1053.04) 879.22,1053.04 cw(c879.22,1071.53) 860.74,1071.53 860.74,1752.8 cw(c883.93,1752.8) 883.93,1776 v1(994.45,1776)
TXD0: J6.3 U4.37 | length 108.1
  Top Layer w15.33: U4.37@1177.22,2788.74 ccw(c1192.64,2804.15) 1192.64,2782.35 J6.3@1283.63,2782.35
TYPEC_N: TP2.2 U4.13 | length 217.4
  Top Layer w7: TP2.2@285,2356.11 306.35,2341.16 ccw(c368.71,2423.62) 368.71,2320.24 ; 368.78,2320.24 443.59,2320.24 ccw(c443.59,2383.4) U4.13@488.25,2338.74
TYPEC_P: TP2.1 U4.14 | length 215.6
  Top Layer w7: TP2.1@285,2277.37 cw(c354.7,2207.67) 310.93,2295.99 cw(c354.7,2207.67) 354.7,2306.24 446,2306.24 cw(c446,2246.49) U4.14@488.25,2288.74
UART_RX: J5.2 R17.2 | length 114.5
  Top Layer w7: R17.2@1081.94,970.12 1081.94,860.78 ccw(c1085.2,860.78) J5.2@1085.2,857.52
UART_TX: J5.1 R16.2 | length 157.4
  Top Layer w7: J5.1@985.2,857.52 1022.26,857.52 ccw(c1022.26,871.01) 1035.74,871.01 R16.2@1035.74,970.12
USART2_RX: R14.1 TP3.1 U4.10 | length 2389.7
  Top Layer w7: R14.1@1225.55,970.12 R14.1@1226,969.67
  Top Layer w10: v1(1226,948.25) R14.1@1226,969.67
  Top Layer w15: TP3.1@386.52,2485.52 485.04,2485.52 ccw(c485.04,2488.74) U4.10@488.25,2488.74 v1(553,2488.74)
  Bottom Layer w7: v1(553,2488.74) 785.42,2488.74 cw(c785.42,2468.15) 806.01,2468.15 806.01,2227.57 806.01,960.76 ccw(c818.48,960.72) 818.48,948.25 ; 818.52,948.25 v1(1226,948.25)
USART2_TX: R13.1 TP3.2 U4.11 | length 2341.1
  Top Layer w10: v1(1179.35,929.87) R13.1@1179.35,970.12
  Top Layer w15: TP3.2@386.52,2406.78 408.61,2420.99 cw(c437.23,2406.78) 437.23,2438.74 U4.11@488.25,2438.74 v1(553,2438.74)
  Bottom Layer w7: v1(553,2438.74) 769.57,2438.74 cw(c769.57,2422.37) 785.94,2422.37 785.94,941.21 ccw(c797.28,941.21) 797.28,929.87 v1(1179.35,929.87)
VBAT: C1.2 C2.2 J2.2 R2.2 R4.2 SW1.3 TP1.1 U1.10 | length 88.3
  Top Layer w15: R2.2@-80.16,1774.63 v1(-36,1774.63) ; R4.2@-80.16,1942.52 v1(-36,1942.52)
  other v1: 108.96,1359.85 132.96,1359.85 156.96,1359.85 180.96,1359.85 108.96,1385.85 132.96,1385.85 156.96,1385.85 180.96,1385.85 108.96,1411.85 132.96,1411.85 156.96,1411.85 180.96,1411.85
VBUS: C12.2 D6.1 F1.1 Q1.2
VDD: C16.2 C17.2 C18.2 C22.2 C23.2 FB1.1 J7.1 R27.2 R31.2 R32.2 R33.2 R45.2 U3.11 U3.37 U3.44 | length 307.2
  Top Layer w7: v1(974.7,1321.89) U3.37@999.05,1321.89
  Top Layer w10: R31.2@939,1203.49 938.73,1203.22 v1(938.73,1189.08) ccw(c950.75,1201.1) 950.75,1184.09 U3.44@999.05,1184.09 ; v1(1218.54,1053.04) U3.11@1218.54,1082.72
  Top Layer w15: R33.2@1012.69,1571.12 R32.2@1059.67,1571.12 1059.67,1595.98 1059.51,1596.14 v1(1059.51,1596.34)
  Top Layer w20: J7.1@1094.45,1863.72 1094.45,1939.53 v1(1094.59,1939.67)
  Bottom Layer w7: C23.2@1001.87,1321.89 ccw(c1001.87,1322.89) C23.2@1002.87,1322.89
  Bottom Layer w15: v1(974.7,1321.89) C23.2@1001.87,1321.89
VDDPA: R34.2 U3.25 | length 61.5
  Top Layer w15: U3.25@1239.82,1344.53 1276.37,1344.53 v1(1276.41,1344.57)
  Bottom Layer w10: R34.2@1255.54,1337.53 cw(c1262.58,1337.53) 1262.58,1344.57 v1(1276.41,1344.57)
VDDRF: C27.2 C28.2 C40.2 R28.2 R34.1 U3.28 U3.46 | length 577
  Top Layer w7: v1@959.7,1144.63 998.95,1144.63 U3.46@999.05,1144.72
  Top Layer w10: U3.28@1179.17,1344.53 1178.98,1344.53 1178.98,1374 v1(1179.35,1374)
  Power w10: v1(959.7,1144.53) 1136.21,1144.53 ccw(c1136.21,1187.68) 1179.35,1187.68 v1(1179.35,1374)
  Bottom Layer w7: R34.1@1218.54,1340.53 cw(c1218.54,1337.53) R34.1@1221.54,1337.53
  Bottom Layer w10: v1(1179.35,1374) cw(c1179.35,1373.19) 1180.17,1373.19 C40.2@1180.17,1340.53
  Bottom Layer w15: C40.2@1180.17,1340.53 R34.1@1218.54,1340.53
VDDRF1V55: C29.2 L2.1 U3.29 U3.45 | length 747
  Top Layer w7: C29.2@1150.48,1420.12 cw(c1150.48,1411.12) 1159.48,1411.12 v1(1159.48,1394.15)
  Top Layer w10: v1(927.41,1164.41) U3.45@999.05,1164.41 ; U3.29@1159.48,1344.53 v1(1159.48,1394.15)
  Top Layer w15: v1(828.12,1150) 828.12,1126.23 L2.1@840.93,1113.41
  Power w10: v1(828.12,1150) cw(c863.81,1114.3) 863.81,1164.79 1131.74,1164.79 ccw(c1131.74,1192.53) 1159.48,1192.53 v1(1159.48,1394.15)
VIN: C6.2 SW1.2 U2.10 U2.11
VUSB: D1.4 D1.5 D1.6 J1.A9 J1.B9 Q1.3
pads on no net: ANT1.2 J4.2@1227.52,-100.43 J4.3 J6.MP1 J6.MP2 J7.7 J7.8 SW1.1 U2.14 U3.2 U3.3 U3.6 U3.7 U3.12 U3.14 U3.15 U3.16 U3.17 U3.22 U3.31 U3.32 U3.33 U3.38 U3.43 U4.4 U4.5 U4.6 U4.7 U4.8 U4.9 U4.12 U4.15 U4.16 U4.18 U4.20 U4.23 U4.24 U4.25 U4.26 U4.28 U4.29 U4.30 U4.31 U4.32 U4.33 U4.34 U4.35 U4.38 U4.39 U6.3 U6.4

## Polygon pours and split planes (outlines as drawn)
GND on Top Layer "NONET_L-01_P-001" (solid, remove dead copper, pour order 13): -157.48,-57.48 -157.48,2892.13 cw(c-57.48,2892.13) -57.48,2992.13 1711.03,2992.13 cw(c1711.03,2892.13) 1811.03,2892.13 1811.03,-57.48 cw(c1711.03,-57.48) 1711.03,-157.48 -57.48,-157.48 cw(c-57.48,-57.48)
3V3 on Top Layer "NONET_L-01_P-001" (solid, pour order 9): 288.58,2892.94 288.58,2717.11 ccw(c299.66,2717.11) 299.66,2706.02 333.58,2706.02 ccw(c333.58,2721.02) 348.58,2721.02 348.58,2818.1 cw(c360,2818.1) 360,2829.52 397.37,2829.52 397.37,2861.51 cw(c406.88,2861.51) 406.88,2871.02 517.78,2871.02 517.78,2906.45 302.09,2906.45 ccw(c302.09,2892.94)
NetD4_2 on Top Layer "NONET_L-01_P-001" (solid, pour order 1): 610.32,-142.31 738.12,-142.31 ccw(c738.12,-100.43) 780,-100.43 780,101.26 590,101.26 441.26,101.26 ccw(c441.26,60) 400,60 400,-20.52 400,-101.67 ccw(c440.64,-101.67) 440.64,-142.31
NetD5_2 on Top Layer "NONET_L-01_P-001" (solid, pour order 0): 940,223.5 1066.5,223.5 cw(c1066.5,190) 1100,190 1100,-105 cw(c1062.69,-105) 1062.69,-142.31 839.89,-142.31 cw(c839.89,-107.42) 805,-107.42 805,101.26 940,101.26
GND on Ground "NONET_L-01_P-001" (solid, pour order 4): -157.48,-57.48 -157.48,2892.13 cw(c-57.48,2892.13) -57.48,2992.13 1711.03,2992.13 cw(c1711.03,2892.13) 1811.03,2892.13 1811.03,-57.48 cw(c1711.03,-57.48) 1711.03,-157.48 -57.48,-157.48 cw(c-57.48,-57.48)
3V3 on Power "NONET_L-01_P-001" (solid, pour order 7): 1811.03,516 1282,516 1282,1818.03 1811.03,1818.03 1811.03,2892.13 ccw(c1711.03,2892.13) 1711.03,2992.13 -57.48,2992.13 ccw(c-57.48,2892.13) -157.48,2892.13 -157.48,2038 399.33,2038 399.33,218 -157.48,218 -157.48,-57.48 ccw(c-57.48,-57.48) -57.48,-157.48 1711.03,-157.48 ccw(c1711.03,-57.48) 1811.03,-57.48
VBAT on Power "NONET_L-01_P-001" (solid, pour order 6): -157.48,2017.25 381,2017.25 381,236 -154.55,236 cw(c-154.55,238.93) -157.48,238.93 -157.48,2020.39
GND on Bottom Layer "NONET_L-01_P-001" (solid, remove dead copper, pour order 14): -157.48,-57.48 -157.48,2892.13 cw(c-57.48,2892.13) -57.48,2992.13 1711.03,2992.13 cw(c1711.03,2892.13) 1811.03,2892.13 1811.03,-57.48 cw(c1711.03,-57.48) 1711.03,-157.48 -57.48,-157.48 cw(c-57.48,-57.48)

## Other copper
Top Layer:
  rectangle net GND: 1538.73,1286.68 1683.4,1349.22
  rectangle net GND: 1339.44,1139.85 1683.4,1247.08
  region net GND: 1758.67,1428.29 1728.01,1428.29 1728.01,1153 1758.67,1153
  rectangle net GND: 1652.75,1294.27 1683.4,1428.29
  rectangle net NetC39_1: 1250.03,1256.93 1286,1268.74
  region net NetC32_2: 1524.38,1325.92 1503.88,1325.92 1503.88,1302.3 1524.38,1302.3
  rectangle net NetC32_1: 1471.57,1302.3 1492.07,1325.92
  rectangle net GND: 959.7,1099.45 1009.87,1111.26
  rectangle net NetC11_2: 295.15,421.02 367.35,434.94
  region net GND: 232.15,452.3 184.91,452.3 184.91,442.85 232.15,442.85
  rectangle net GND: 271.52,442.85 318.77,452.3
  region net GND: 361.8,916.69 ccw(c394.61,916.69) 394.61,883.88 434.97,883.88 434.97,874.52 cw(c430.56,874.52) 430.56,870.11 365.4,870.11 cw(c365.4,873.7) 361.8,873.7
  region net VBUS: 255.24,1142.57 ccw(c255.24,1125.01) 237.68,1125.01 237.68,1000.28 ccw(c252.43,1000.28) 252.43,985.53 283.31,985.53 ccw(c283.31,999.9) 297.68,999.9 297.68,1059.6 cw(c309.73,1059.6) 309.73,1071.65 462.19,1071.65 ccw(c462.19,1096.98) 487.51,1096.98 487.51,1195.57 cw(c508.79,1195.57) 508.79,1216.85 549.85,1216.85 ccw(c549.85,1235) 568,1235 568,1318 ccw(c541.54,1318) 541.53,1344.46 367.58,1344.46 ccw(c367.58,1321.96) 345.07,1321.96 345.07,1164.61 cw(c323.03,1164.61) 323.03,1142.57
  region net VUSB: -53.9,1089 ccw(c-53.9,1075.19) -67.71,1075.19 -67.71,940.09 ccw(c-51.94,940.09) -51.93,924.32 316.22,924.32 316.22,964.13 11.87,964.13 cw(c11.87,976.87) -0.87,976.87 -0.87,1036.12 cw(c11.56,1036.12) 11.56,1048.55 93.34,1048.55 93.34,1089
  region net NetC5_2: 37,1156.92 cw(c37,1176.6) 17.32,1176.6 17.32,1267.32 cw(c32,1267.32) 32,1282 180.7,1282 cw(c180.7,1265.02) 197.68,1265.02 197.68,1169.3 cw(c184.36,1169.3) 184.36,1155.99 37.93,1155.99 cw(c37.93,1156.92)
  region net NetC3_2: 600.16,1374.58 747.58,1374.58 ccw(c747.58,1413) 786,1413 786,1493.93 786,1578 ccw(c750.72,1578) 750.72,1613.28 652.86,1613.28 519.72,1613.28 cw(c519.71,1623.18) 509.82,1623.18 509.82,1638.65 484.82,1638.65 484.82,1623.8 cw(c474.29,1623.8) 474.29,1613.28 351.5,1613.28 351.5,1543.49 461.37,1543.49 cw(c461.5,1527.68) 477.31,1527.8 477.32,1437.57 cw(c459.6,1437.57) 459.6,1419.86 414.32,1419.86 414.32,1374.58
  region net VBAT: 302.29,1613.28 302.29,1351.29 cw(c277,1351.29) 277,1326 61,1326 cw(c61,1349.99) 37,1350 37,1477 cw(c63,1477) 63,1503 214.84,1503 ccw(c214.84,1522.52) 234.37,1522.52 234.37,1613.28
  region net VIN: -67.69,524.96 ccw(c-67.69,497.4) -95.25,497.4 ccw(c-67.69,497.4) -67.69,469.85 151.52,469.85 151.52,524.96
  region net NetL1_2: 295.15,521.59 295.15,571.5 ccw(c283.44,571.5) 283.44,583.2 262.68,583.2 262.68,684.27 cw(c273.41,684.27) 273.41,695 306.92,695 cw(c306.93,683.16) 318.77,683.15 318.77,521.59
  region net NetL1_1: 208.53,526.31 208.53,571.5 cw(c220.24,571.5) 220.24,583.2 241,583.2 241,684.27 ccw(c230.27,684.27) 230.27,695 196.76,695 ccw(c196.75,683.16) 184.91,683.15 184.91,526.31
  region net DC-IN: 663.1,221 663.1,169.9 ccw(c708.87,169.9) 708.87,124.13 913.48,124.13 913.48,381.13 814.2,381.13 cw(c814.97,410.1) 786,410.88 786,1150 ccw(c760.03,1150) 760.02,1175.98 535.43,1175.98 ccw(c535.43,1147.55) 507,1147.55 507,1019.66 cw(c479.54,1019.66) 479.54,992.2 395.74,992.2 ccw(c395.74,973.46) 377,973.46 377,917.61 ccw(c395.52,917.6) 395.53,899.08 636.92,899.08 cw(c636.92,872.9) 663.1,872.9
  region net GND: 999.05,1103.39 999.05,1111.26 1024.87,1111.26 1024.87,1103.39
  region net PG: 273.15,1661.71 273.15,1692.02 302.29,1692.02 302.29,1661.71
  region net NetC3_2: 484.82,1638.65 509.82,1638.65 509.82,1588 484.82,1588
  region net NetNTC1_2: 380.63,1681.39 351.5,1681.39 351.5,1784.52 380.63,1784.52
  region net NetNTC1_2: 380.63,1793.24 380.63,1750.81 297.76,1750.81 297.76,1793.24
  region net GND: 380.63,1656.54 326.89,1656.54 326.89,1638.04 380.63,1638.04 380.63,1647.34
  region net VIN: 208.53,516.57 208.53,477.06 -67.69,477.06 -67.69,516.57
  region net 3V3: 509.54,513.78 509.54,381.89 401.75,381.89 401.75,460.21 295.15,460.21 295.15,513.78
Power:
  region net VDD: 65 vertices and 7 holes, not listed, extent 834.5,1180.06 1161,2017.25
Bottom Layer:
  region net VDDRF: 1011.87,978.1 1011.87,1162.61 945.36,1162.61 945.36,1124.66 964.8,1124.66 cw(c964.8,1111.74) 977.72,1111.74 977.72,1085.5 977.72,1046.34 cw(c965.86,1046.34) 965.86,1034.48 943.68,1034.48 ccw(c943.68,1022.71) 931.91,1022.71 931.91,991.15 ccw(c944.96,991.15) 944.96,978.1
  region net VDD: 926.21,1180.84 1089.54,1180.84 cw(c1089.54,1172.11) 1098.27,1172.11 1098.27,1133.23 1098.27,1089.19 ccw(c1112.72,1089.19) 1112.72,1074.75 1182.78,1074.75 1182.78,978.1 1244.24,978.1 1244.24,1102.48 1168.29,1102.48 cw(c1168.29,1112.93) 1157.84,1112.93 1157.84,1134.29 cw(c1169.5,1134.29) 1169.5,1145.96 1229.19,1145.96 1229.19,1171 1137.77,1171 cw(c1137.77,1180.84) 1127.94,1180.84 1127.94,1204.35 ccw(c1111.86,1204.36) 1111.85,1220.44 977.72,1220.44 cw(c965.15,1220.44) 965.15,1207.87 926.21,1207.87
  region net 3V3-SW: 1736.52,2257.88 1736.52,2232.88 1668.32,2232.88 1668.32,2257.88
  region net 3V3: 1049.37,978.1 1174.95,978.1 1174.95,1066.75 1049.37,1066.75
Multi-Layer:
  pour cut-out: 1377.96,919.55 1811.03,919.55 1811.03,545.53 1377.96,545.53
  pour cut-out: 1590,1725.83 1811.96,1725.83 1811.96,1509.29 1590,1509.29

## Silkscreen, mask and mechanical layers (free items; w line width, h text height)
Top Overlay:
  lines w5: 115.04,1049.21 115.04,957.69 219.12,957.69 ; 219.12,935.79 219.12,957.69 ; 219.12,1049.21 219.12,957.69 ; 264.02,2786.02 287.02,2786.02 ; 275.52,2774.52 275.52,2797.52 ; 969.85,989.16 1006.36,989.16 ; 1193,1485 993.76,1485 993.76,1394.15 1362.91,1394.15 ; 1294,1204 1344.8,1204 1344.8,1237.05 1409.5,1237.05 1409.5,1204 1469.97,1204 1469.97,1237.27 1528.97,1237.27 1528.97,1206.93 1598.4,1206.93 1598.4,1236.43 1728.84,1236.43 1728.84,1338.45 1627.89,1338.45 1627.89,1307.83 1548.08,1307.83 1548.08,1338.45 ; 1295.79,1293.11 1329.91,1293.11 1329.91,1332.11 1303.95,1332.11 1303.95,1382.7 ; 1475.33,1382.45 1475.33,1360 1548.08,1360 1548.08,1338.45 ; 1548.08,1338.45 1548,1338.45 1548.08,1338.45 ; 404,1859 825,1859 825,1965 404,1965 404,1859 ; 719.72,938.53 969.31,938.53 969.31,1040.37 719.72,1040.37 719.72,938.53 ; 1005,2029.03 1550,2029.03 1550,2180 1005,2180 1005,2029.03 ; 1006.36,944.32 1255.05,944.32 1255.05,1034 1006.36,1034 1006.36,944.32
  text "2" at 1513.44,2195.33 h50
  text "1" at 410.2,1979.62 h50
  text "49" at 1662.12,1875.68 h30 r90
  text "BATTERY" at -99.67,1690.97 h60
  text "1" at 953.36,1452.34 h50
  text "+" at 181.68,1397.34 h70
  text "2" at 1366.11,1189.11 h50
  text "DC INPUT" at 1018.94,275.62 h60
  text "SOLAR" at 421.16,261.57 h60
  text "+" at 603.8,9.14 h100
  text "DC 4.5V-18V" at 636.18,-142.31 h60
Bottom Overlay:
  lines w5: 974.7,1151.11 1013.95,1151.11
  text "Gateway-Device-v1.0" at 1045.61,-129.06 h50
Board Outline:
  the board outline again, w5
Fabrication:
  drawing of 295 lines, arcs and shapes, not listed
  text "Layer" at 3045.58,2945 h60
  text "Name" at 3455.49,2945 h60
  text "Material" at 4385.23,2945 h60
  text "Thickness" at 5245,2945 h60
  text "Constant" at 5894.84,2945 h60
  text "Board Layer Stack" at 6464.7,2945 h60
  text "Top Overlay" at 3455.49,2825 h60
  text "Top Solder" at 3455.49,2705 h60
  text "Solder Resist" at 4385.23,2705 h60
  text "0.012mm" at 5245,2705 h60
  text "3.5" at 5894.84,2705 h60
  text "1" at 3045.58,2585 h60
  text "Top Layer" at 3455.49,2585 h60
  text "0.035mm" at 5245,2585 h60
  text "Dielectric 2" at 3455.49,2465 h60
  text "PP-006" at 4385.23,2465 h60
  text "0.203mm" at 5245,2465 h60
  text "4.4" at 5894.84,2465 h60
  text "2" at 3045.58,2345 h60
  text "Ground" at 3455.49,2345 h60
  text "CF-004" at 4385.23,2345 h60
  text "0.030mm" at 5245,2345 h60
  text "Dielectric 1" at 3455.49,2225 h60
  text "FR-4" at 4385.23,2225 h60
  text "1.030mm" at 5245,2225 h60
  text "4.6" at 5894.84,2225 h60
  text "3" at 3045.58,2105 h60
  text "Power" at 3455.49,2105 h60
  text "CF-004" at 4385.23,2105 h60
  text "0.030mm" at 5245,2105 h60
  text "Dielectric 3" at 3455.49,1985 h60
  text "PP-006" at 4385.23,1985 h60
  text "0.203mm" at 5245,1985 h60
  text "4.4" at 5894.84,1985 h60
  text "4" at 3045.58,1865 h60
  text "Bottom Layer" at 3455.49,1865 h60
  text "0.035mm" at 5245,1865 h60
  text "Bottom Solder" at 3455.49,1745 h60
  text "Solder Resist" at 4385.23,1745 h60
  text "0.012mm" at 5245,1745 h60
  text "3.5" at 5894.84,1745 h60
  text "Bottom Overlay" at 3455.49,1625 h60
  text "Total board thickness:" at 3045.58,1505 h60
  text "1.589mm" at 5245,1505 h60
Drill Drawing:
  circle w10: c35.62,5002.28 r33.33
  circle w10: c35.62,4252.28 r20
  circle w10: c35.62,4252.28 r33.33
  lines w10: 2.29,4385.61 18.96,4385.61 18.96,4368.94 52.29,4368.94 52.29,4385.61 68.96,4385.61 68.96,4418.94 52.29,4418.94 52.29,4435.61 18.96,4435.61 18.96,4418.94 2.29,4418.94 2.29,4385.61 ; 2.29,4535.61 18.96,4535.61 35.62,4518.94 52.29,4535.61 68.96,4535.61 52.29,4552.28 68.96,4568.94 52.29,4568.94 35.62,4585.61 18.96,4568.94 2.29,4568.94 18.96,4552.28 2.29,4535.61 ; 2.29,4668.94 35.62,4685.61 68.96,4668.94 52.29,4702.28 68.96,4735.61 35.62,4718.94 2.29,4735.61 18.96,4702.28 2.29,4668.94 ; 2.29,4852.28 35.62,4818.94 68.96,4852.28 35.62,4885.61 2.29,4852.28 ; 2.29,5118.94 2.29,5135.61 18.96,5152.28 2.29,5168.94 2.29,5185.61 18.96,5185.61 35.62,5168.94 52.29,5185.61 68.96,5185.61 68.96,5168.94 52.29,5152.28 68.96,5135.61 68.96,5118.94 52.29,5118.94 35.62,5135.61 18.96,5118.94 2.29,5118.94 ; 2.29,5268.94 68.96,5268.94 68.96,5335.61 2.29,5335.61 2.29,5268.94 ; 2.29,5485.61 68.96,5485.61 35.62,5418.94 2.29,5485.61 ; 2.29,5568.94 68.96,5568.94 68.96,5635.61 2.29,5635.61 2.29,5568.94 ; 15.62,5582.28 55.62,5582.28 55.62,5622.28 15.62,5622.28 15.62,5582.28
  lines w15: -57.5,4173.94 7082.56,4173.94 ; -57.5,5673.94 7082.56,5673.94 ; 493.38,4023.94 493.38,5823.94 ; 1093.22,4023.94 1093.22,5823.94 ; 2232.88,4023.94 2232.88,5823.94 ; 2738.76,4023.94 2738.76,5823.94 ; 3472.56,4023.94 3472.56,5823.94 ; 4972.11,4023.94 4972.11,5823.94 ; 5561.96,4023.94 5561.96,5823.94 ; 6307.76,4023.94 6307.76,5823.94 ; -57.5,4023.94 7082.56,4023.94 7082.56,5823.94 -57.5,5823.94 -57.5,4023.94
  text "Symbol" at 32.5,5718.94 h72
  text "Count" at 538.38,5718.94 h72
  text "Hole Size" at 1138.22,5718.94 h72
  text "Plated" at 2277.88,5718.94 h72
  text "Hole Type" at 2783.76,5718.94 h72
  text "Drill Layer Pair" at 3517.56,5718.94 h72
  text "Via/Pad" at 5017.11,5718.94 h72
  text "Pad Shape" at 5606.96,5718.94 h72
  text "Template" at 6352.76,5718.94 h72
  text "795" at 538.38,5568.94 h60
  text "7.87mil (0.200mm)" at 1138.22,5568.94 h60
  text "PTH" at 2277.88,5568.94 h60
  text "Round" at 2783.76,5568.94 h60
  text "Top Layer - Bottom Layer" at 3517.56,5568.94 h60
  text "(Mixed)" at 5017.11,5568.94 h60
  text "Rounded" at 5606.96,5568.94 h60
  text "(Mixed)" at 6352.76,5568.94 h60
  text "4" at 538.38,5418.94 h60
  text "20.47mil (0.520mm)" at 1138.22,5418.94 h60
  text "PTH" at 2277.88,5418.94 h60
  text "Slot" at 2783.76,5418.94 h60
  text "Top Layer - Bottom Layer" at 3517.56,5418.94 h60
  text "Pad" at 5017.11,5418.94 h60
  text "Rounded" at 5606.96,5418.94 h60
  text "(Mixed)" at 6352.76,5418.94 h60
  text "4" at 538.38,5268.94 h60
  text "31.50mil (0.800mm)" at 1138.22,5268.94 h60
  text "PTH" at 2277.88,5268.94 h60
  text "Round" at 2783.76,5268.94 h60
  text "Top Layer - Bottom Layer" at 3517.56,5268.94 h60
  text "Pad" at 5017.11,5268.94 h60
  text "(Mixed)" at 5606.96,5268.94 h60
  text "(Mixed)" at 6352.76,5268.94 h60
  text "8" at 538.38,5118.94 h60
  text "35.43mil (0.900mm)" at 1138.22,5118.94 h60
  text "PTH" at 2277.88,5118.94 h60
  text "Round" at 2783.76,5118.94 h60
  text "Top Layer - Bottom Layer" at 3517.56,5118.94 h60
  text "Pad" at 5017.11,5118.94 h60
  text "(Mixed)" at 5606.96,5118.94 h60
  text "(Mixed)" at 6352.76,5118.94 h60
  text "4" at 538.38,4968.94 h60
  text "36.00mil (0.914mm)" at 1138.22,4968.94 h60
  text "PTH" at 2277.88,4968.94 h60
  text "Round" at 2783.76,4968.94 h60
  text "Top Layer - Bottom Layer" at 3517.56,4968.94 h60
  text "Pad" at 5017.11,4968.94 h60
  text "Rounded" at 5606.96,4968.94 h60
  text "c152h91o0_0" at 6352.76,4968.94 h60
  text "2" at 538.38,4818.94 h60
  text "47.24mil (1.200mm)" at 1138.22,4818.94 h60
  text "PTH" at 2277.88,4818.94 h60
  text "Round" at 2783.76,4818.94 h60
  text "Top Layer - Bottom Layer" at 3517.56,4818.94 h60
  text "Pad" at 5017.11,4818.94 h60
  text "Rounded" at 5606.96,4818.94 h60
  text "c230h120" at 6352.76,4818.94 h60
  text "1" at 538.38,4668.94 h60
  text "62.99mil (1.600mm)" at 1138.22,4668.94 h60
  text "NPTH" at 2277.88,4668.94 h60
  text "Round" at 2783.76,4668.94 h60
  text "Top Layer - Bottom Layer" at 3517.56,4668.94 h60
  text "Pad" at 5017.11,4668.94 h60
  text "Rounded" at 5606.96,4668.94 h60
  text "c0hn160m10" at 6352.76,4668.94 h60
  text "3" at 538.38,4518.94 h60
  text "62.99mil (1.600mm)" at 1138.22,4518.94 h60
  text "PTH" at 2277.88,4518.94 h60
  text "Round" at 2783.76,4518.94 h60
  text "Top Layer - Bottom Layer" at 3517.56,4518.94 h60
  text "Pad" at 5017.11,4518.94 h60
  text "Rounded" at 5606.96,4518.94 h60
  text "(Mixed)" at 6352.76,4518.94 h60
  text "1" at 538.38,4368.94 h60
  text "70.87mil (1.800mm)" at 1138.22,4368.94 h60
  text "NPTH" at 2277.88,4368.94 h60
  text "Round" at 2783.76,4368.94 h60
  text "Top Layer - Bottom Layer" at 3517.56,4368.94 h60
  text "Pad" at 5017.11,4368.94 h60
  text "Rounded" at 5606.96,4368.94 h60
  text "c0hn180m10" at 6352.76,4368.94 h60
  text "4" at 538.38,4218.94 h60
  text "122.05mil (3.100mm)" at 1138.22,4218.94 h60
  text "PTH" at 2277.88,4218.94 h60
  text "Round" at 2783.76,4218.94 h60
  text "Top Layer - Bottom Layer" at 3517.56,4218.94 h60
  text "Pad" at 5017.11,4218.94 h60
  text "Rounded" at 5606.96,4218.94 h60
  text "c500h310" at 6352.76,4218.94 h60
  text "826 Total" at 538.38,4068.94 h60
  text "Slot definitions :" at 32.5,3923.97 h60
  text "Routed Path Length" at 1065.19,3923.97 h60
  text "= Calculated from tool start centre position to tool end centre position." at 2167.86,3923.97 h60
  text "Hole Length" at 1065.19,3823.99 h60
  text "= Routed Path Length + Tool Size = Slot length as defined in the PCB layout" at 1757.99,3823.99 h60

## Dimensions
-157.48,2892.13 to 1811.03,2892.13 on Dimension
-57.48,-157.48 to -57.48,2992.13 on Dimension